# Altium PCB Layout.PcbDoc
Units mm, origin at the board's own origin, x right, y up, seen from the top; angles counter-clockwise.
Board outline 72.5 x 42.54 mm, 2 copper layers (Top Layer, Bottom Layer), stack 1.135 mm thick; 7 components, 3 nets, 13 pads, 0 vias.
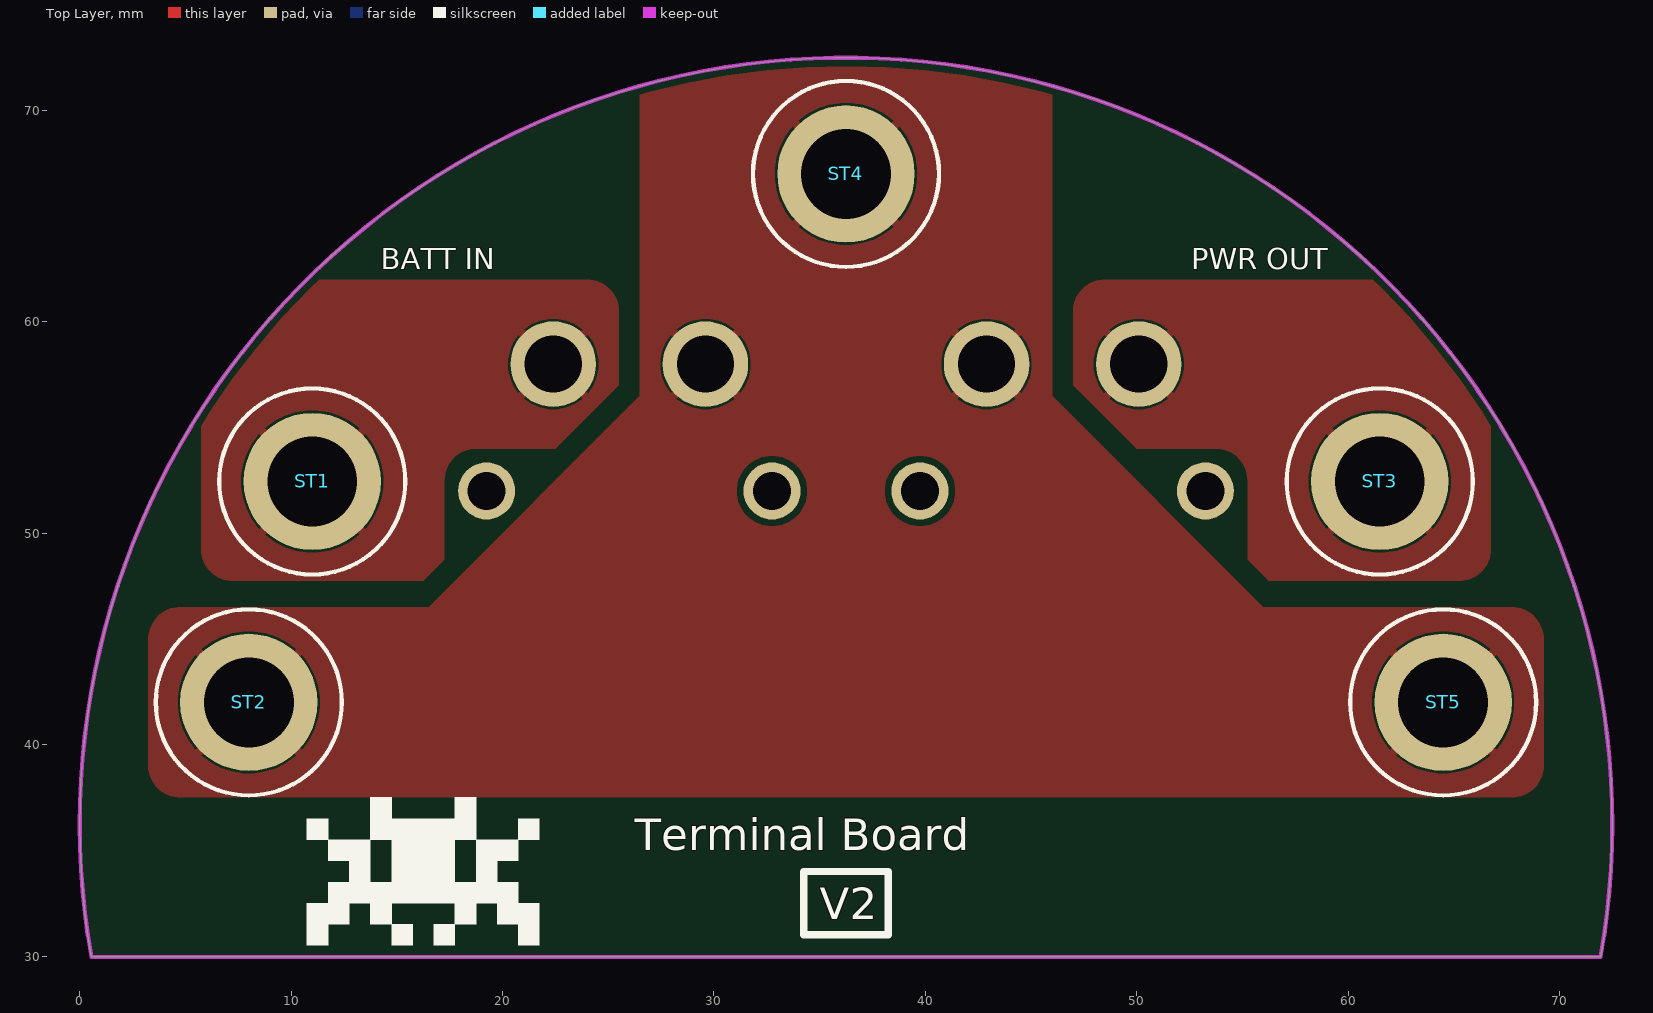
[diagram p0: Top Layer view]
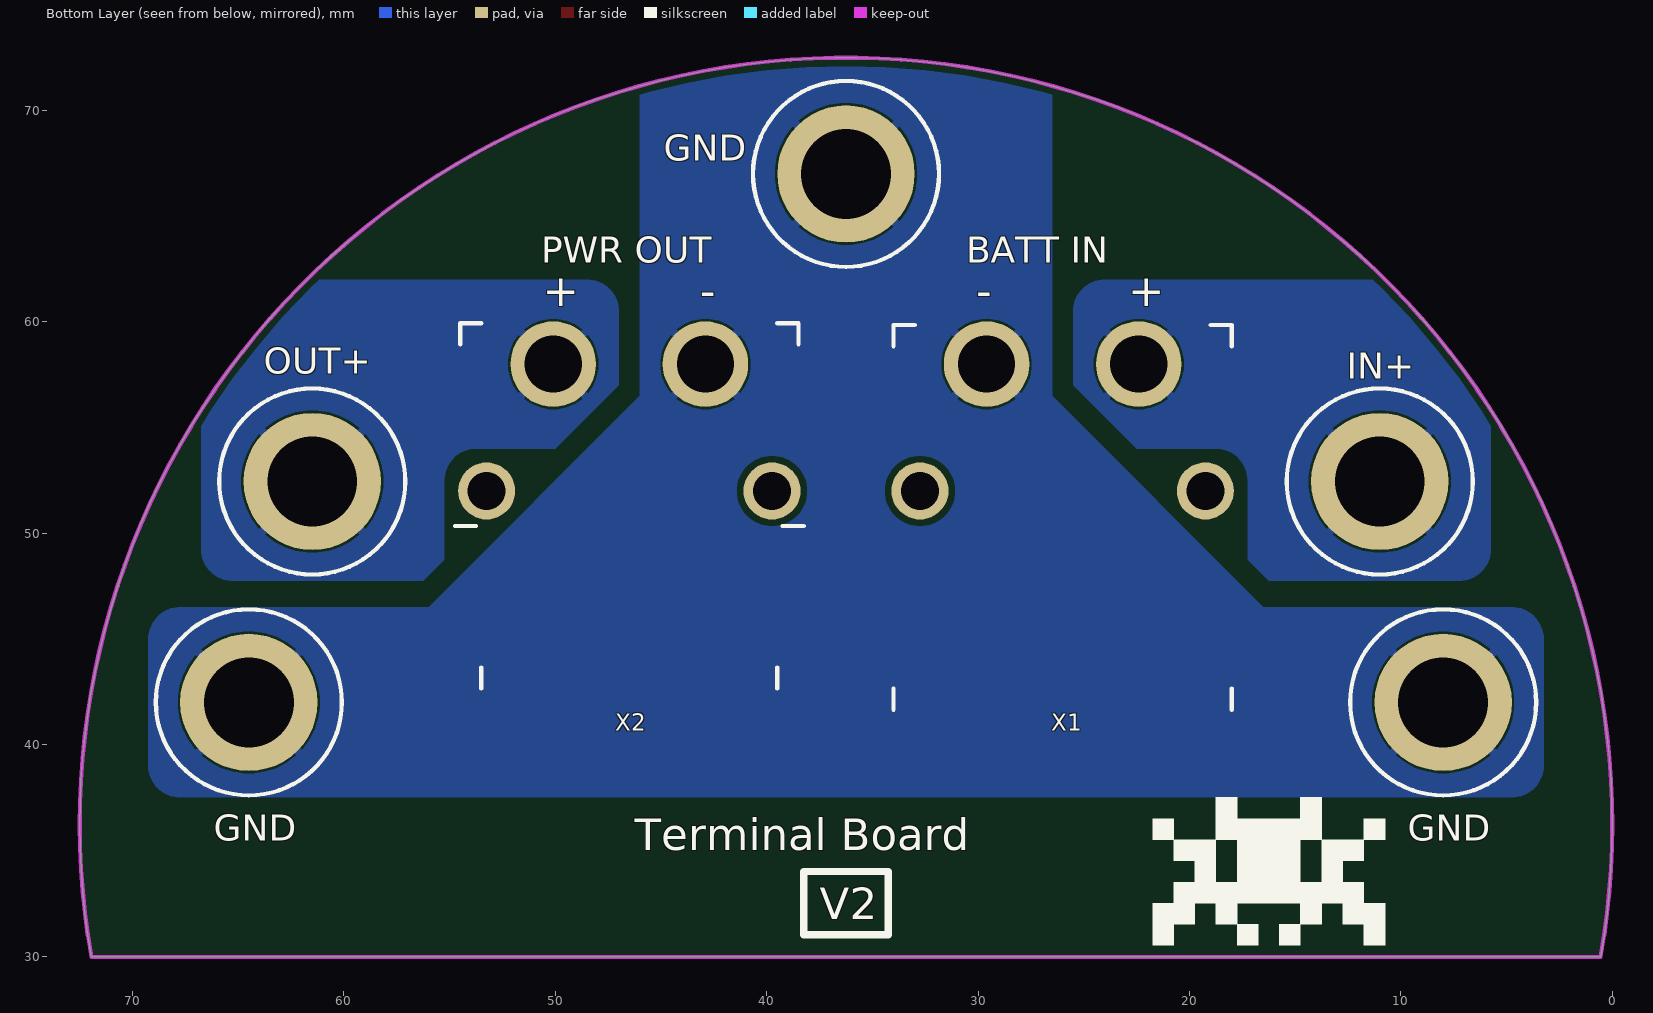
[diagram p1: Bottom Layer view, seen from below]

## Layer stack, top to bottom
Top Solder: solder mask 0.0102, Solder Resist, Dk 3.8
Top Layer: signal copper 0.035
Dielectric 1: dielectric 1.065, FR-4, Dk 4.8
Bottom Layer: signal copper 0.035
Bottom Solder: solder mask 0.0102, Solder Resist, Dk 3.8

## Board outline
0.551,29.955 cw(c36.25,36.25) 71.949,29.955 71.949,29.959

## Design rules (kind name [scope] priority, off if disabled: settings)
BoardOutlineClearance [All] p1: gap=0.2 ignorepadtopadclearanceinfootprint=FALSE
Clearance "inPolygon Clearance" [InPolygon] p1: gap=0.3 ignorepadtopadclearanceinfootprint=TRUE // this rule ensures that every net within a polygon of a different net has a set clearance from the poly
Clearance "High Current Polygon Clearance" [(InPolygon AND InNetClass('High_Current_Nets'))] p2: gap=0 ignorepadtopadclearanceinfootprint=TRUE // this rule ensures that every net within a polygon of a different net has a set clearance from the poly
Clearance "Different Diff Pair" [All] p3: gap=0.2 ignorepadtopadclearanceinfootprint=TRUE
Clearance "Same Diff Pair" [All] p4: gap=0.1 ignorepadtopadclearanceinfootprint=TRUE
Clearance "Different Nets" [not InAnyDifferentialPair] p5: gap=0.3 ignorepadtopadclearanceinfootprint=TRUE except(0.1: Arc-SMDPad Arc-THPad Arc-Via Arc-Text Track-SMDPad Track-THPad Track-Via Track-Text SMDPad-Text THPad-Text Via-Text Fill-Text Poly-Text Region-Text Text-Text; 0.12: Arc-Arc Arc-Track Track-Track; 0.15: SMDPad-SMDPad SMDPad-THPad SMDPad-Via THPad-THPad THPad-Via Via-Via; 0.2: Arc-Hole Track-Hole SMDPad-Hole THPad-Hole Via-Hole Fill-Hole Poly-Hole Region-Hole Text-Hole)
Clearance "Same Net" [not InAnyDifferentialPair] p6: gap=0 ignorepadtopadclearanceinfootprint=TRUE except(0.1: THPad-Via; 0.18: Arc-Arc Arc-Track Track-Track)
ComponentClearance [All] p1: gap=0.102 collisioncheckmode=3 verticalgap=0.102 showdistances=TRUE
DiffPairsRouting "Ethernet Routing" [InDifferentialPairClass('Ethernet_Pairs')] p1: maxlimit=0.2 minlimit=0.2 mostfreqgap=0.2 toplayer_minwidth=0.25 toplayer_maxwidth=0.25 toplayer_prefwidth=0.25 bottomlayer_minwidth=0.25 bottomlayer_maxwidth=0.25 bottomlayer_prefwidth=0.25 impedanceprofiledriven=TRUE maxuncoupledlength=12.7
DiffPairsRouting "USB Routing" [InDifferentialPairClass('USB_Pairs')] p2: maxlimit=0.127 minlimit=0.127 mostfreqgap=0.127 toplayer_minwidth=0.23 toplayer_maxwidth=0.23 toplayer_prefwidth=0.23 bottomlayer_minwidth=0.23 bottomlayer_maxwidth=0.23 bottomlayer_prefwidth=0.23 maxuncoupledlength=12.7
DiffPairsRouting "CAN Routing" [InDifferentialPairClass('CAN_Pairs')] p3: maxlimit=0.5 minlimit=0.5 mostfreqgap=0.5 toplayer_minwidth=0.201 toplayer_maxwidth=0.201 toplayer_prefwidth=0.201 bottomlayer_minwidth=0.201 bottomlayer_maxwidth=0.201 bottomlayer_prefwidth=0.201 impedanceprofiledriven=TRUE maxuncoupledlength=12.7
Height [All] p1: minheight=0 maxheight=1816.048 prefheight=12.7
HoleSize [All] p1: absolutevalues=TRUE maxlimit=6.3 minlimit=0.3 maxpercent=80.000 minpercent=20.000
HoleToHoleClearance [All] p1: gap=0.25 allowstackedmicrovias=FALSE
MatchedLengths "XTAL Nets Matched Delays" [InNetClass('XTAL_Nets')] p1: tolerance=25.4 checknetsindiffpair=FALSE checkdiffpairvsdiffpair=TRUE checkxsignals=TRUE checkothers=TRUE usedelayunits=TRUE delaytolerance=10.000000
MatchedLengths "Diff Pair Matched Delays" [InDifferentialPairClass('Ethernet_Pairs') or InDifferentialPairClass('USB_Pairs') or InDifferentialPairClass('CAN_Pairs')] p2: tolerance=5 checknetsindiffpair=TRUE checkdiffpairvsdiffpair=FALSE checkxsignals=FALSE checkothers=FALSE usedelayunits=TRUE delaytolerance=100.000000 phasematching=TRUE phasedelaytolerance=5.000000 phasedistance=12.7
MinimumAnnularRing [All] p1: minimumring=0.2
MinimumSolderMaskSliver [All] p1: minsoldermaskwidth=0
PlaneClearance "Supply Net Clearance" [InNetClass('Supply_Nets')] p1: clearance=0.5
PlaneClearance "All Nets" [All] p2: clearance=0.3
PolygonConnect "High Current" [InNetClass('High_Current_Nets')] p1: thpad.connectstyle=Relief thpad.reliefconductorwidth=0.4 thpad.reliefentries=4 thpad.polygonreliefangle="90 Angle" thpad.airgapwidth=0.1 thpad.conductorbypadedge=TRUE thpad.mindistance=0.381 thpad.enablemindistance=FALSE smdpad.connectstyle=Direct smdpad.reliefconductorwidth=0.254 smdpad.reliefentries=4 smdpad.polygonreliefangle="90 Angle" smdpad.airgapwidth=0.254 via.connectstyle=Direct via.reliefconductorwidth=0.254 via.reliefentries=4 via.polygonreliefangle="90 Angle" via.airgapwidth=0.254
PolygonConnect "Supply Nets" [InNetClass('Supply_Nets') OR InNetClass('Supply_Net')] p2: connectstyle=Relief reliefconductorwidth=0.3 reliefentries=4 polygonreliefangle="90 Angle" conductorbypadedge=TRUE mindistance=0.381 enablemindistance=FALSE airgapwidth=0.254
PolygonConnect General [All] p3: connectstyle=Relief reliefconductorwidth=0.254 reliefentries=4 polygonreliefangle="90 Angle" airgapwidth=0.254
RoutingVias [All] p1: holewidth=0.2 width=0.35 viastyle="Through Hole" minholewidth=0.15 minwidth=0.3 maxholewidth=6.3 maxwidth=6.55
SilkToSilkClearance [All] p1: silktosilkclearance=0
SilkToSolderMaskClearance [All] p1: minsilkscreentomaskgap=0 clearancetoexposedcopper=TRUE
SolderMaskExpansion [All] p1: expansion=0.075 istentingtop=FALSE
SupplyNets "Schematic Supply Nets" [InNet('BATT Switched')] p1: voltage=0.000
SupplyNets "Schematic Supply Nets_2" [InNet('BATTERY IN')] p2: voltage=0.000
SupplyNets "Schematic Supply Nets_3" [InNet('GND')] p3: voltage=0.000
UnRoutedNet [All] p1: checkbadconnections=TRUE
Width "nRF Width" [InNetClass('nRF Signal')] p1: maxlimit=0.379 minlimit=0.379 preferedwidth=0.379 minimp=50.000000 maximp=50.000000 favimp=50.000000 checkconnectedcopper=TRUE
Width [All] p2: maxlimit=100 minlimit=0.1 preferedwidth=0.2
20 further rules are at their usual default settings.

## Classes and differential pairs
net class High_Current_Nets: "BATT Switched" "BATTERY IN" GND

## Components (designator, comment, footprint, x,y, rotation, side; value= is the part's Value field where it differs from the comment)
ST1 "M4 5mm" "[Standoff] M4 5mm" 11,52.45 r0 top
ST2 "M4 5mm" "[Standoff] M4 5mm" 8,42 r0 top
ST3 "M4 5mm" "[Standoff] M4 5mm" 61.5,52.45 r0 top
ST4 "M4 5mm" "[Standoff] M4 5mm" 36.25,67 r0 top
ST5 "M4 5mm" "[Standoff] M4 5mm" 64.5,42 r0 top
X1 "[XT60] 2pin Male 90deg Thru-Hole" "[XT60] 2pin Male 90deg Thru-Hole" 26,58 r0 bottom
X2 "[XT60] 2pin Female 90deg Thru-Hole" "[XT60] 2pin Female 90deg Thru-Hole" 46.5,58 r0 bottom

## Footprints (in the part's own frame and the unit in brackets; to place one, negate y for a bottom-side part, rotate by r counter-clockwise, add the part's x,y. Pads: shape width x height; smd on the part's side, far side on the other; paste and mask are expansions set on the pad)
"[Standoff] M4 5mm" [mm] "971050474"
  round 6.5 hole 4.25: 1(0,0)
  silkscreen extent -4.4,-4.4 4.4,4.4, body extent -3.5,-4.04 3.5,4.04, height 5.25
"[XT60] 2pin Female 90deg Thru-Hole" [mm]
  round 4.05 hole 2.7: 1(3.6,0) 2(-3.6,0)
  round 2.7 hole 1.8: MH(-6.75,6) MH(6.75,6)
  silkscreen extent -8.25,-1.94 8.25,15.35, body extent -7.75,-1.94 7.75,15.26, height 8.37
"[XT60] 2pin Male 90deg Thru-Hole" [mm]
  round 4.05 hole 2.7: 1(-3.6,0) 2(3.6,0)
  round 2.7 hole 1.8: MH(-6.75,6) MH(6.75,6)
  silkscreen extent -8,-1.85 8,16.35, body extent -7.95,-1.98 7.95,16.3, height 8.44

## Part data
ST1 ST2 ST3 ST4 ST5: library part "[Standoff] M4 5mm", "971050474", Supplier Part Number 1=732-12900-ND, Supplier 1=DigiKey, System=Connector
X1: "XT60PW-M"
X2: "XT60PW-F30"

## Nets (pads, with @x,y where several pads share a name; then routed paths per layer and width w, separated by ;. In a path a pad name is that pad's centre, name@x,y a point inside that pad or via, vN(x,y) a via of type N, cw(c..) or ccw(c..) an arc to the next point about the centre after c; other vN are vias at no path point)
"BATT Switched": ST3.1 X2.1
"BATTERY IN": ST1.1 X1.1
GND: ST2.1 ST4.1 ST5.1 X1.2 X2.2
pads on no net: X1.MH X2.MH

## Polygon pours and split planes (outlines as drawn)
GND on Top Layer "GND Top Poly" (solid, pour order 4): 4.75,46.5 16.5,46.5 26.5,56.5 26.5,72.5 46,72.5 46,56.5 56,46.5 67.75,46.5 cw(c67.75,45) 69.25,45 69.25,39 cw(c67.75,39) 67.75,37.5 4.75,37.5 cw(c4.75,39) 3.25,39 3.25,45 cw(c4.75,45)
"BATTERY IN" on Top Layer "Batt In Top Poly" (solid, pour order 1): 25.5,60.5 25.5,57 22.5,54 18.75,54 ccw(c18.75,52.5) 17.25,52.5 17.25,48.75 16.25,47.75 7.25,47.75 cw(c7.25,49.25) 5.75,49.25 5.75,62 24,62 cw(c24,60.5)
"BATT Switched" on Top Layer "Batt Switched Top Poly" (solid, pour order 0): 47,60.5 47,57 50,54 53.75,54 cw(c53.75,52.5) 55.25,52.5 55.25,48.75 56.25,47.75 65.25,47.75 ccw(c65.25,49.25) 66.75,49.25 66.75,62 48.5,62 ccw(c48.5,60.5)
GND on Bottom Layer "GND Bottom Poly" (solid, pour order 5): 4.75,46.5 16.5,46.5 26.5,56.5 26.5,72.5 46,72.5 46,56.5 56,46.5 67.75,46.5 cw(c67.75,45) 69.25,45 69.25,39 cw(c67.75,39) 67.75,37.5 4.75,37.5 cw(c4.75,39) 3.25,39 3.25,45 cw(c4.75,45)
"BATT Switched" on Bottom Layer "Batt Switched Bottom Poly" (solid, pour order 3): 47,60.5 47,57 50,54 53.75,54 cw(c53.75,52.5) 55.25,52.5 55.25,48.75 56.25,47.75 65.25,47.75 ccw(c65.25,49.25) 66.75,49.25 66.75,62 48.5,62 ccw(c48.5,60.5)
"BATTERY IN" on Bottom Layer "Batt In Bottom Poly" (solid, pour order 2): 25.5,60.5 25.5,57 22.5,54 18.75,54 ccw(c18.75,52.5) 17.25,52.5 17.25,48.75 16.25,47.75 7.25,47.75 cw(c7.25,49.25) 5.75,49.25 5.75,62 24,62 cw(c24,60.5)
GND on Top Solder "GND Top Solder" (solid, pour order 6): 4.75,46.5 16.5,46.5 26.5,56.5 26.5,72.5 46,72.5 46,56.5 56,46.5 67.75,46.5 cw(c67.75,45) 69.25,45 69.25,39 cw(c67.75,39) 67.75,37.5 4.75,37.5 cw(c4.75,39) 3.25,39 3.25,45 cw(c4.75,45)
"BATTERY IN" on Top Solder "Batt In Top Solder" (solid, pour order 8): 25.5,60.5 25.5,57 22.5,54 18.75,54 ccw(c18.75,52.5) 17.25,52.5 17.25,48.75 16.25,47.75 7.25,47.75 cw(c7.25,49.25) 5.75,49.25 5.75,62 24,62 cw(c24,60.5)
"BATT Switched" on Top Solder "Batt Switched Top Solder" (solid, pour order 7): 47,60.5 47,57 50,54 53.75,54 cw(c53.75,52.5) 55.25,52.5 55.25,48.75 56.25,47.75 65.25,47.75 ccw(c65.25,49.25) 66.75,49.25 66.75,62 48.5,62 ccw(c48.5,60.5)

## Keep-outs
Keep-Out Layer:
  lines w0.2: 71.949,29.955 ccw(c36.25,36.25) 0.551,29.955 71.949,29.959

## Silkscreen, mask and mechanical layers (free items; w line width, h text height)
Top Overlay:
  region: 10.75,36.22 10.75,36.5 11.749,36.5 11.749,36.499 11.75,36.499 11.75,35.5 10.75,35.5 10.75,36.218
  region: 20.75,35.808 20.75,36.499 20.751,36.499 20.751,36.5 21.75,36.5 21.75,35.5 20.75,35.5 20.75,35.807
  region: 17.75,31.42 17.75,30.5 16.75,30.5 16.75,31.499 16.751,31.499 16.751,31.5 17.75,31.5 17.75,31.422
  region: 15.124,30.5 14.75,30.5 14.75,31.5 15.749,31.5 15.749,31.499 15.75,31.499 15.75,30.5 15.125,30.5
  region: 13.768,37.5 14.75,37.5 14.75,36.5 17.75,36.5 17.75,37.5 18.75,37.5 18.75,35.5 17.75,35.5 17.75,33.5 18.75,33.5 18.75,35.5 20.75,35.5 20.75,34.501 20.749,34.501 20.749,34.5 19.75,34.5 19.75,33.5 20.749,33.5 20.749,33.499 20.75,33.499 20.75,32.5 21.75,32.5 21.75,30.5 20.75,30.5 20.75,31.5 19.751,31.5 19.751,31.501 19.75,31.501 19.75,32.5 18.75,32.5 18.75,31.501 18.749,31.501 18.749,31.5 17.75,31.5 17.75,32.5 14.75,32.5 14.75,31.5 13.751,31.5 13.751,31.501 13.75,31.501 13.75,32.5 12.75,32.5 12.75,31.501 12.749,31.501 12.749,31.5 11.75,31.5 11.75,30.5 10.75,30.5 10.75,32.5 11.75,32.5 11.75,33.499 11.751,33.499 11.751,33.5 12.75,33.5 12.75,34.5 11.751,34.5 11.751,34.501 11.75,34.501 11.75,35.5 13.75,35.5 13.75,33.5 14.75,33.5 14.75,35.5 13.75,35.5 13.75,37.5 13.766,37.5
  lines w0.35: 34.25,31 38.25,31 38.25,34 34.25,34 34.25,31
  text "BATT IN" at 14.251,62.5 h1
  text "PWR OUT" at 52.584,62.5 h1
  text "Terminal Board" at 26.253,35 h1.5
  text "V2" at 35,31.75 h1.5
Bottom Overlay:
  region: 13.768,37.5 14.75,37.5 14.75,36.5 17.75,36.5 17.75,37.5 18.75,37.5 18.75,35.5 17.75,35.5 17.75,33.5 18.75,33.5 18.75,35.5 20.75,35.5 20.75,34.501 20.749,34.501 20.749,34.5 19.75,34.5 19.75,33.5 20.749,33.5 20.749,33.499 20.75,33.499 20.75,32.5 21.75,32.5 21.75,30.5 20.75,30.5 20.75,31.5 19.751,31.5 19.751,31.501 19.75,31.501 19.75,32.5 18.75,32.5 18.75,31.501 18.749,31.501 18.749,31.5 17.75,31.5 17.75,32.5 14.75,32.5 14.75,31.5 13.751,31.5 13.751,31.501 13.75,31.501 13.75,32.5 12.75,32.5 12.75,31.501 12.749,31.501 12.749,31.5 11.75,31.5 11.75,30.5 10.75,30.5 10.75,32.5 11.75,32.5 11.75,33.499 11.751,33.499 11.751,33.5 12.75,33.5 12.75,34.5 11.751,34.5 11.751,34.501 11.75,34.501 11.75,35.5 13.75,35.5 13.75,33.5 14.75,33.5 14.75,35.5 13.75,35.5 13.75,37.5 13.766,37.5
  region: 15.124,30.5 14.75,30.5 14.75,31.5 15.749,31.5 15.749,31.499 15.75,31.499 15.75,30.5 15.125,30.5
  region: 17.75,31.42 17.75,30.5 16.75,30.5 16.75,31.499 16.751,31.499 16.751,31.5 17.75,31.5 17.75,31.422
  region: 20.75,35.808 20.75,36.499 20.751,36.499 20.751,36.5 21.75,36.5 21.75,35.5 20.75,35.5 20.75,35.807
  region: 10.75,36.22 10.75,36.5 11.749,36.5 11.749,36.499 11.75,36.499 11.75,35.5 10.75,35.5 10.75,36.218
  lines w0.35: 34.25,31 38.25,31 38.25,34 34.25,34 34.25,31
  text "GND" at 44.882,67.625 h1.25
  text "BATT IN" at 30.561,62.8 h1.25
  text "PWR OUT" at 50.665,62.8 h1.25
  text "+" at 22.9,60.75 h1.5
  text "-" at 30.1,60.75 h1.5
  text "-" at 42.4,60.75 h1.5
  text "+" at 50.6,60.75 h1.5
  text "OUT+" at 63.791,57.55 h1.25
  text "IN+" at 12.562,57.3 h1.25
  text "GND" at 9.666,35.45 h1.25
  text "GND" at 66.166,35.45 h1.25
  text "Terminal Board" at 46.247,35 h1.5
  text "V2" at 37.5,31.75 h1.5
Poly Planning:
  lines w0.1: 3.25,39 ccw(c4.75,39) 4.75,37.5 ; 3.25,45 cw(c4.75,45) 4.75,46.5 ; 5.75,49.25 ccw(c7.25,49.25) 7.25,47.75 ; 17.25,52.5 cw(c18.75,52.5) 18.75,54 ; 24,62 cw(c24,60.5) 25.5,60.5 ; 47,60.5 cw(c48.5,60.5) 48.5,62 ; 53.75,54 cw(c53.75,52.5) 55.25,52.5 ; 65.25,47.75 ccw(c65.25,49.25) 66.75,49.25 ; 67.75,37.5 ccw(c67.75,39) 69.25,39 ; 67.75,46.5 cw(c67.75,45) 69.25,45 ; 3.25,37.5 69.25,37.5 69.25,46.5 56,46.5 46,56.5 46,72.5 26.5,72.5 26.5,56.5 16.5,46.5 3.25,46.5 3.25,37.5 ; 5.75,47.75 5.75,62 25.5,62 25.5,57 22.5,54 17.25,54 17.25,48.75 16.25,47.75 5.75,47.75 ; 47,57 50,54 55.25,54 55.25,48.75 56.25,47.75 66.75,47.75 66.75,62 47,62 47,57